# Altium PCB PCB1.PcbDoc
Units mm, origin at the board's own origin, x right, y up, seen from the top; angles counter-clockwise.
Board outline 152.4 x 101.6 mm, 4 copper layers (Signal, GND1, POWER, GND2), stack 0.602 mm thick; 65 components, 46 nets, 210 pads, 2 vias.
Unrouted connection lines stored in the file: 1.
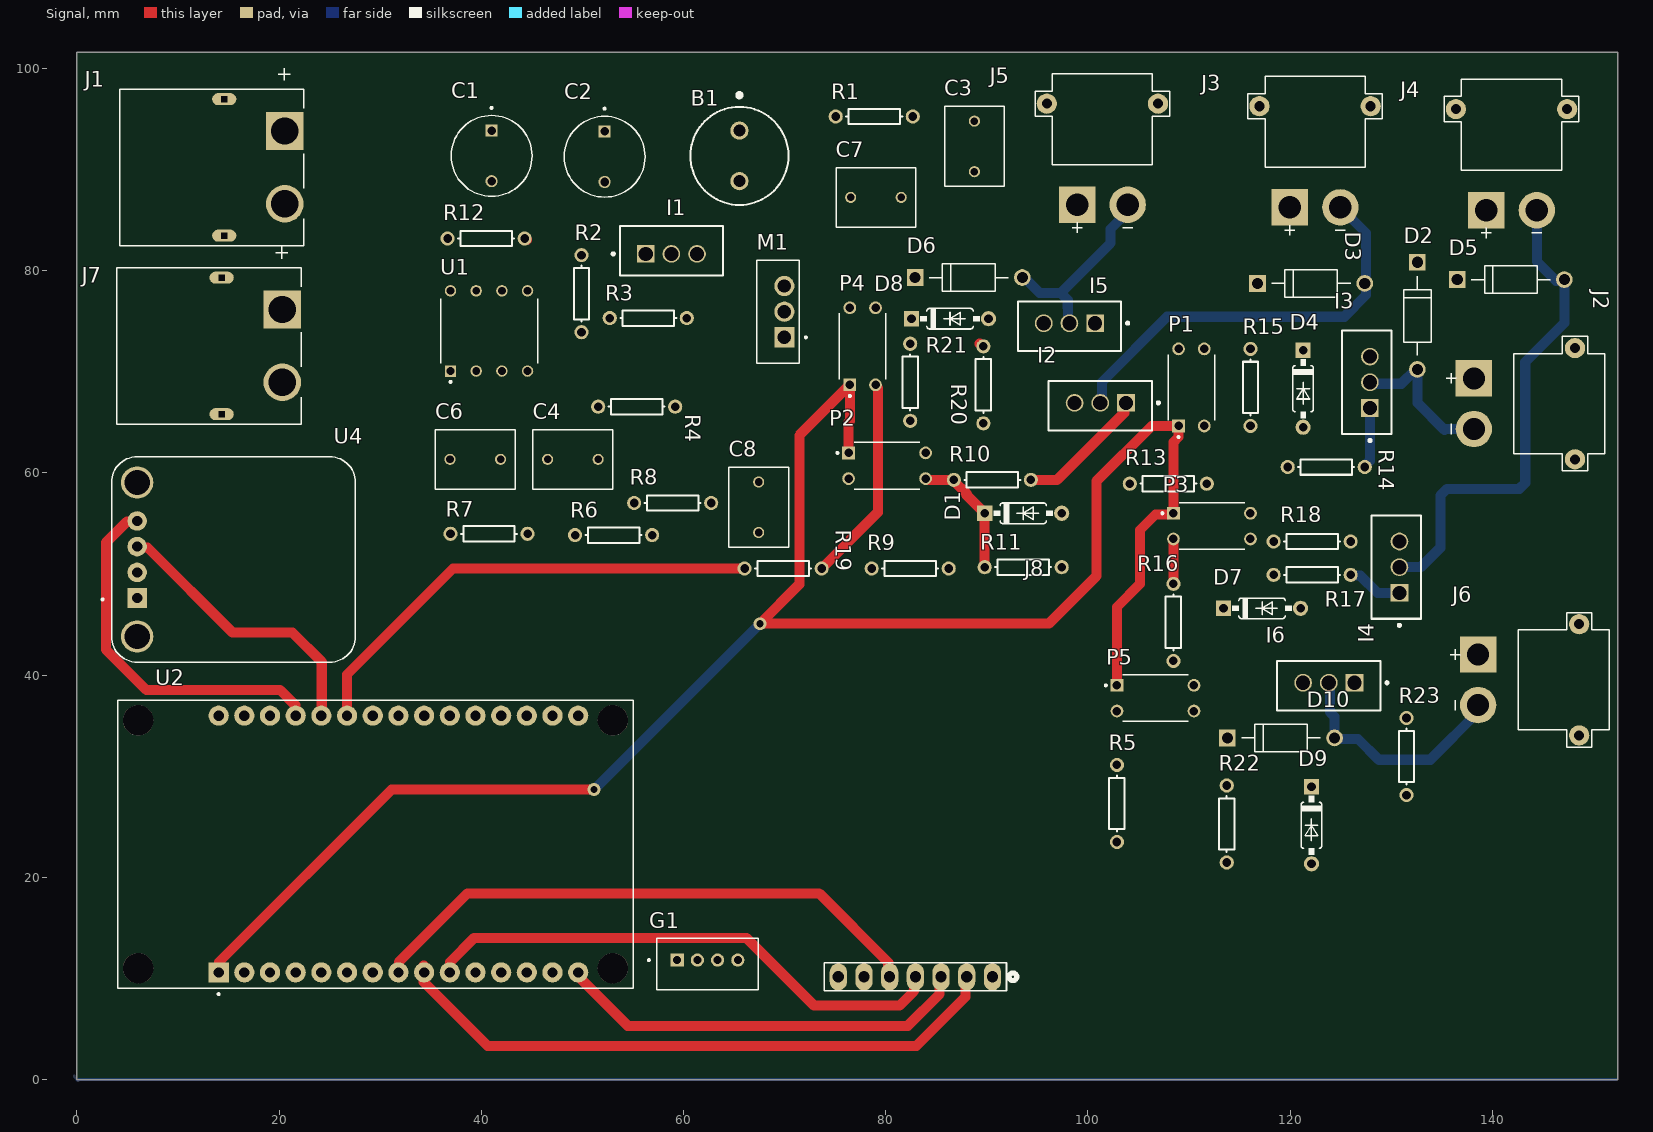
[diagram p0: Signal view]
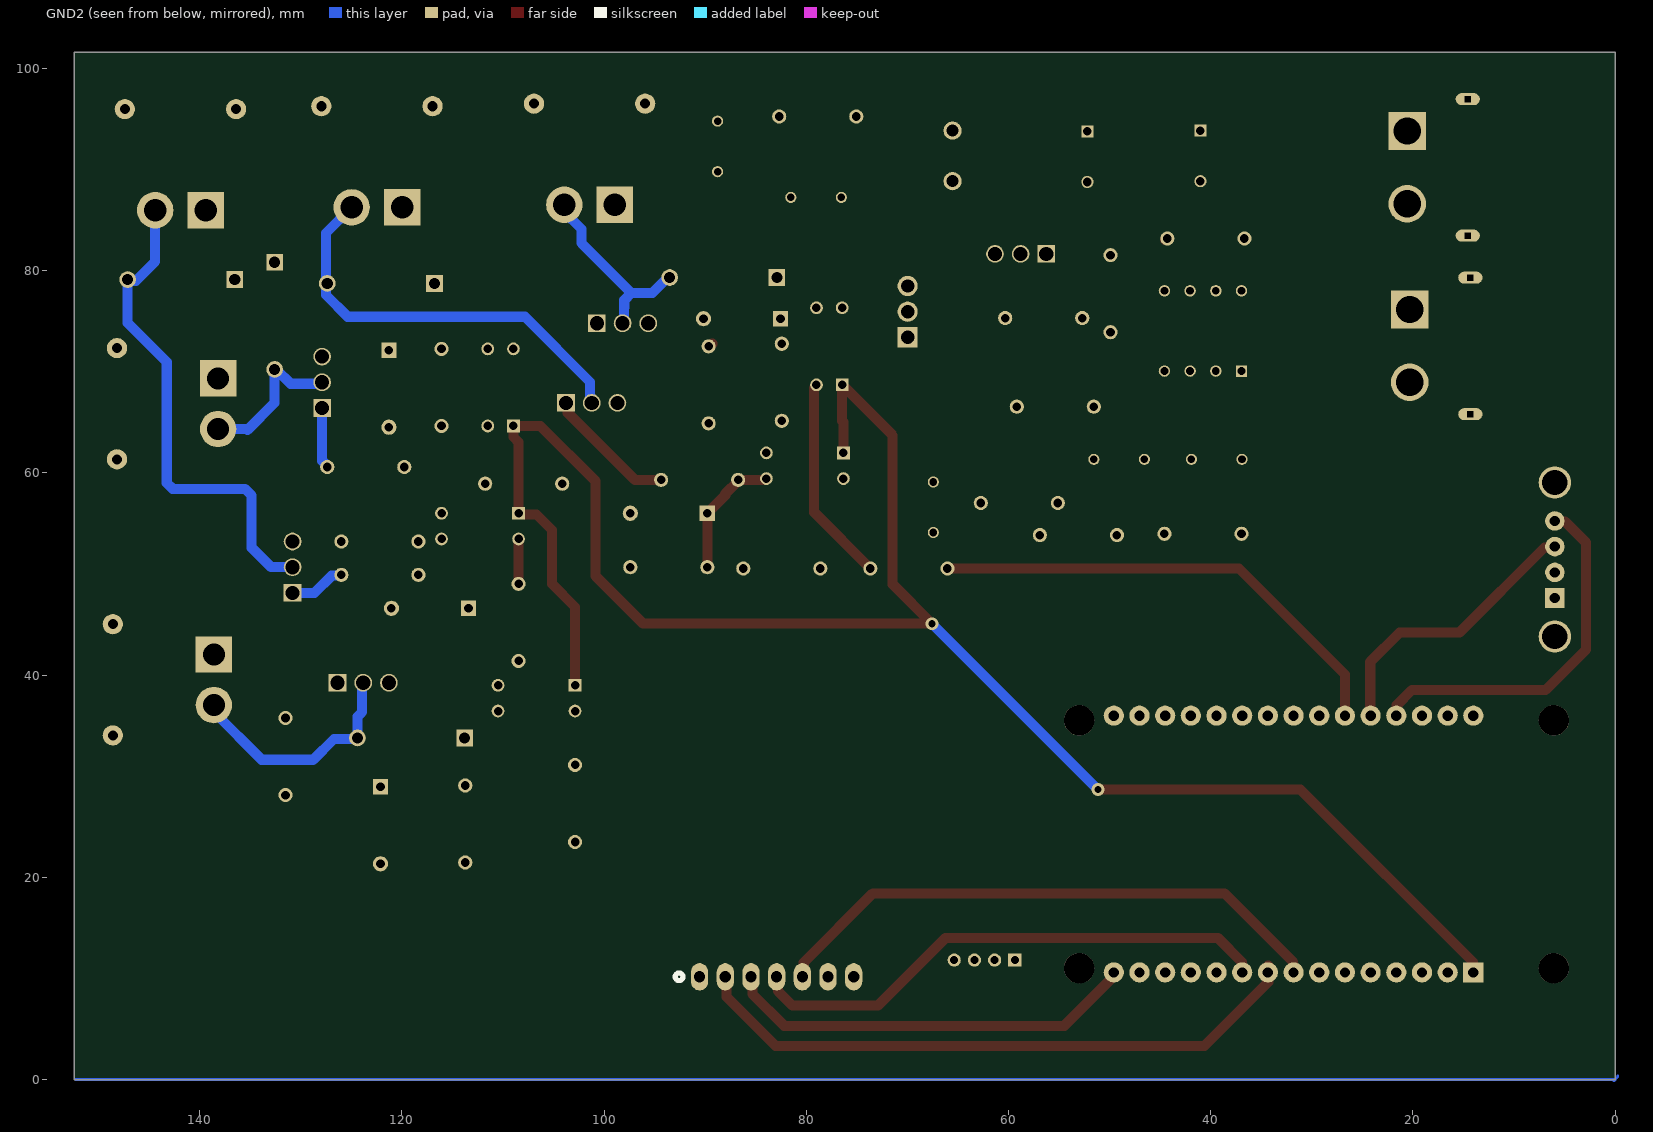
[diagram p1: GND2 view, seen from below]
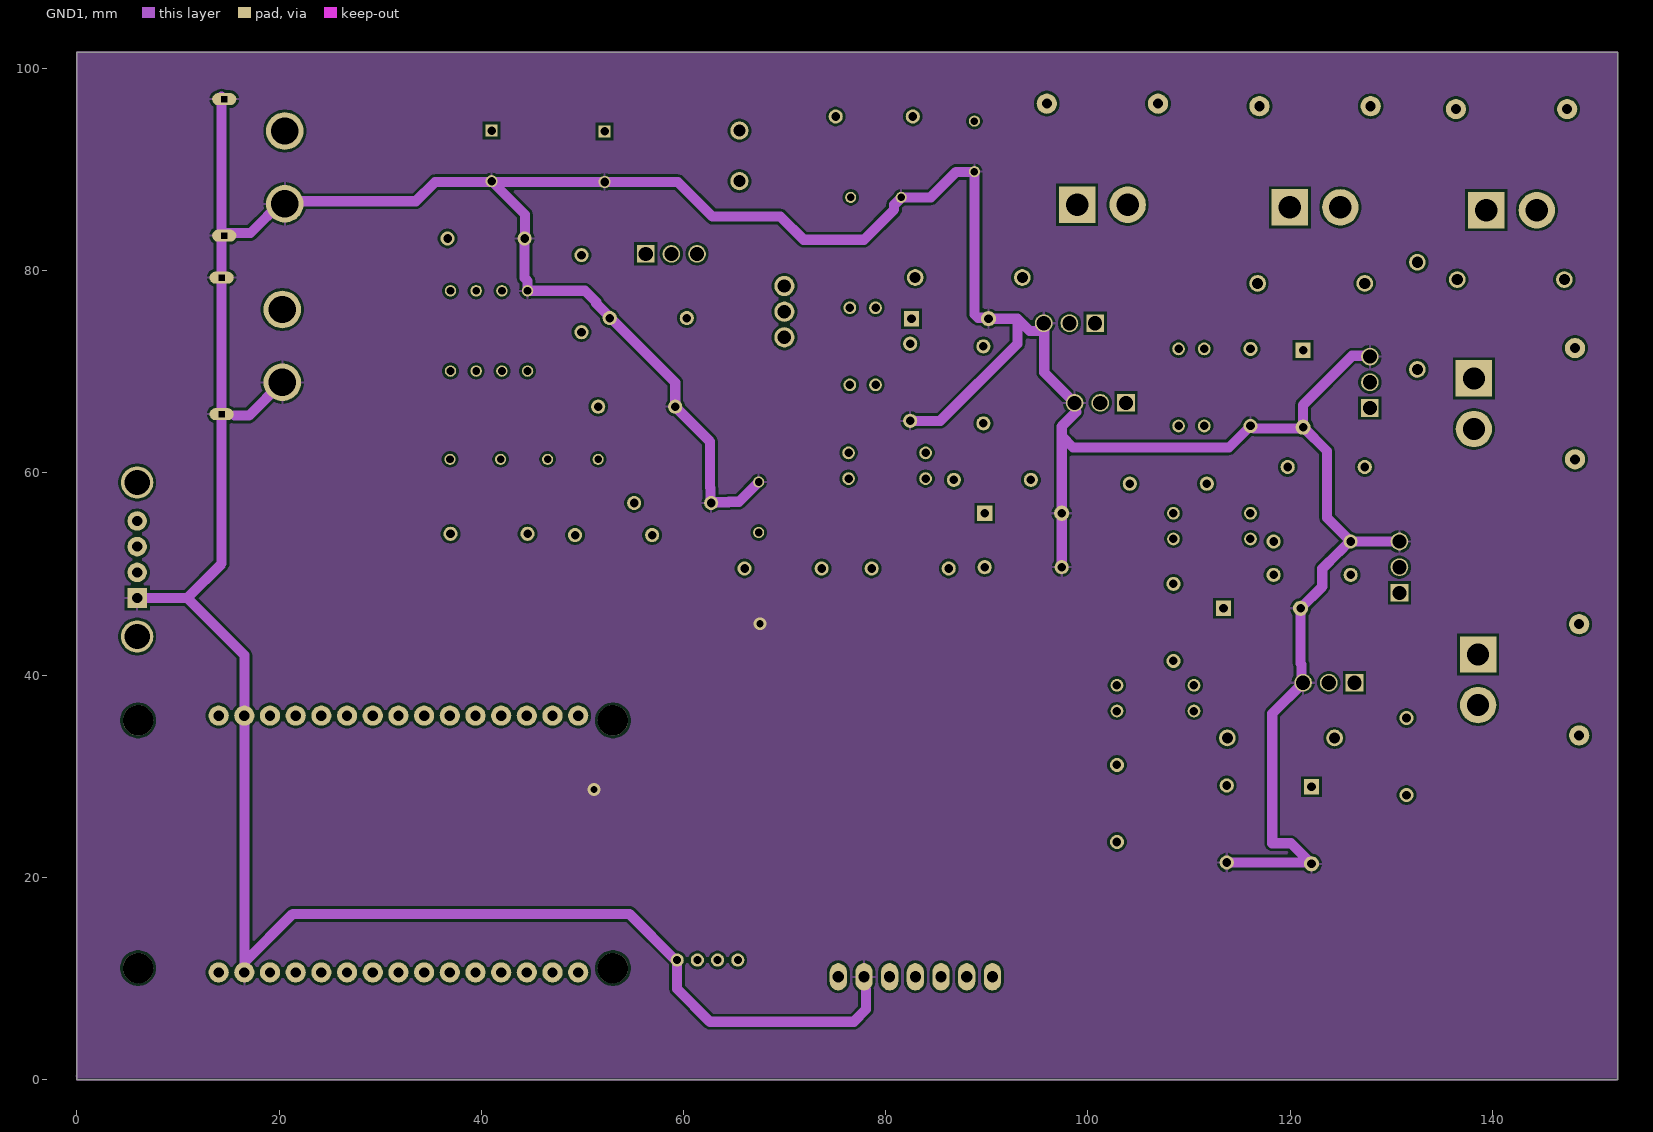
[diagram p2: GND1]
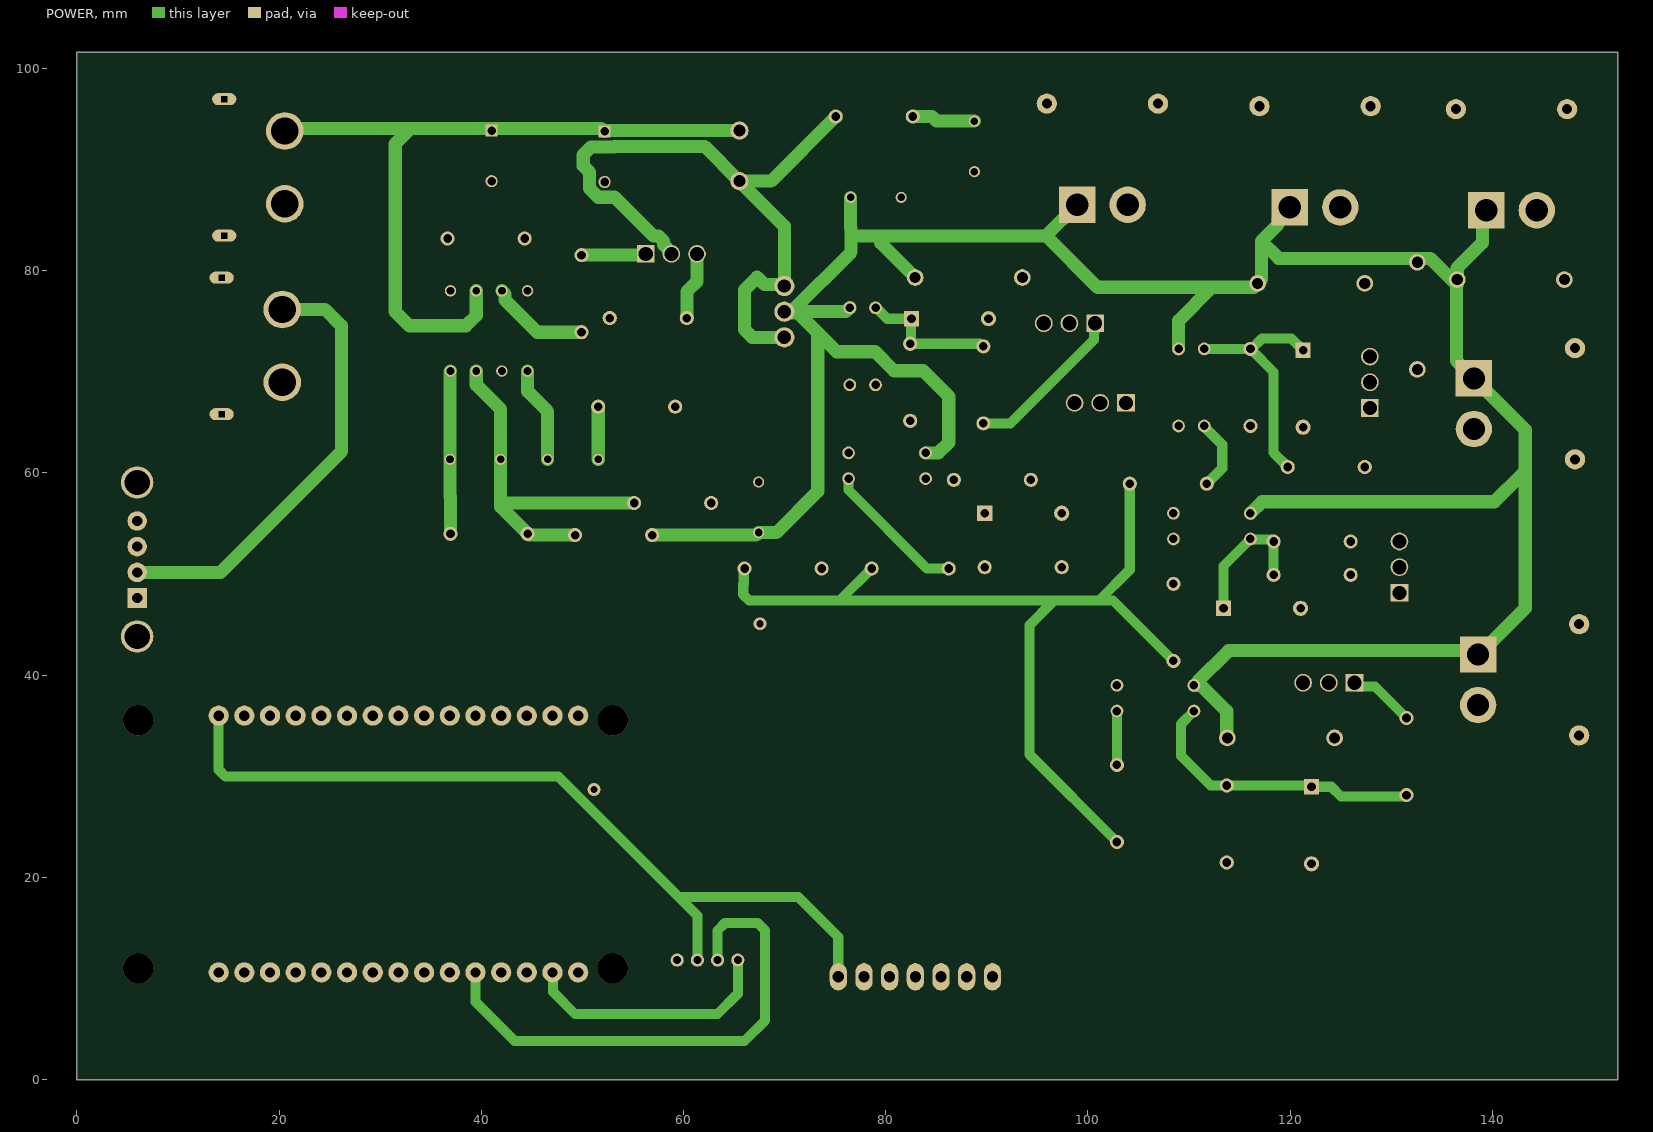
[diagram p3: POWER]

## Layer stack, top to bottom
Top Solder: solder mask 0.0102, Solder Resist, Dk 3.5
Signal: signal copper 0.035
Dielectric 2: prepreg 0.0711, PP-006, Dk 4.1
GND1: signal copper 0.035
Dielectric 1: dielectric 0.32, FR-4, Dk 4.8
POWER: signal copper 0.035
Dielectric 3: prepreg 0.0711, PP-006, Dk 4.1
GND2: signal copper 0.035
Bottom Solder: solder mask 0.0102, Solder Resist, Dk 3.5

## Board outline
0,0 152.4,0 152.4,101.6 0,101.6

## Design rules (kind name [scope] priority, off if disabled: settings)
AssemblyTestPointUsage [All] p1: isadvanced=TRUE
AssemblyTestpoint [All] p1: isadvanced=TRUE testpointundercomponent=TRUE minsize=1.016 maxsize=2.54 preferedsize=1.524 minholesize=0 maxholesize=1.016 preferedholesize=0.813 testpointgrid=0.025 usegrid=TRUE gridtolerance=0 allowsidetop=TRUE allowsidebottom=TRUE
Clearance Clearance_1 [(ExistsOnLayer('GND1') Or ExistsOnLayer('POWER')) vs (ExistsOnLayer('GND1') Or ExistsOnLayer('POWER'))] p1: gap=0.254 ignorepadtopadclearanceinfootprint=FALSE sourcerule=38 cellrowname=All cellrowtype=0 cellcolname=All cellcoltype=0 innerlayers=TRUE
Clearance Clearance_2 [(ExistsOnLayer('Signal') Or ExistsOnLayer('GND2')) vs (ExistsOnLayer('Signal') Or ExistsOnLayer('GND2'))] p2: gap=0.254 ignorepadtopadclearanceinfootprint=FALSE sourcerule=38 cellrowname=All cellrowtype=0 cellcolname=All cellcoltype=0 outerlayers=TRUE
Clearance [All] p3: gap=0.254 ignorepadtopadclearanceinfootprint=FALSE ismatrix=TRUE
ComponentClearance [All] p1: isadvanced=TRUE gap=0.254 collisioncheckmode=3 verticalgap=0.254 showdistances=FALSE
FabricationTestPointUsage [All] p1: isadvanced=TRUE valid=0 allowmultiple=FALSE
FabricationTestpoint [All] p1: isadvanced=TRUE side=3 testpointundercomponent=TRUE minsize=1.016 maxsize=2.54 preferedsize=1.524 minholesize=0 maxholesize=1.016 preferedholesize=0.813 testpointgrid=0.025 allowsidetop=TRUE allowsidebottom=TRUE usegrid=TRUE gridtolerance=0
FanoutControl Fanout_BGA [IsBGA] p1: isadvanced=TRUE bgadir=Out bgaviamode=Centered fanoutstyle=Auto fanoutdirection=Alternating viagrid=0.025 // Fanout_BGA (Default Rule)
FanoutControl Fanout_LCC [IsLCC] p2: isadvanced=TRUE bgadir=Out bgaviamode=Centered fanoutstyle=Auto fanoutdirection=Alternating viagrid=0.025 // Fanout_LCC (Default Rule)
FanoutControl Fanout_SOIC [IsSOIC] p3: isadvanced=TRUE bgadir=Out bgaviamode=Centered fanoutstyle=Auto fanoutdirection=Alternating viagrid=0.025 // Fanout_SOIC (Default Rule)
FanoutControl Fanout_Small [(CompPinCount < 5)] p4: isadvanced=TRUE bgadir=Out bgaviamode=Centered fanoutstyle=Auto fanoutdirection=OutThenIn viagrid=0.025 // Fanout_Small (Default Rule)
FanoutControl Fanout_Default [All] p5: isadvanced=TRUE bgadir=Out bgaviamode=Centered fanoutstyle=Auto fanoutdirection=Alternating viagrid=0.025 // Fanout_Default (Default Rule)
Height [All] p1: isadvanced=TRUE minheight=0 maxheight=25.4 prefheight=12.7
HoleSize [All] p1: isadvanced=TRUE absolutevalues=TRUE maxlimit=2.54 minlimit=0.025 maxpercent=80.000 minpercent=20.000
HoleToHoleClearance [All] p1: isadvanced=TRUE gap=0.254 allowstackedmicrovias=TRUE
LayerPairs [All] p1: isadvanced=TRUE enforce=TRUE
MinimumSolderMaskSliver [All] p1: isadvanced=TRUE minsoldermaskwidth=0.254
NetAntennae [All] p1: isadvanced=TRUE netantennaetolerance=0
PasteMaskExpansion [All] p1: isadvanced=TRUE expansion=0
PlaneClearance [All] p1: isadvanced=TRUE clearance=0.508
PlaneConnect [All] p1: isadvanced=TRUE planeconnectstyle=Relief reliefexpansion=0.508 reliefentries=4 reliefconductorwidth=0.254 reliefairgap=0.254
PolygonConnect [All] p1: connectstyle=Relief reliefconductorwidth=0.254 reliefentries=4 polygonreliefangle="90 Angle" airgapwidth=0.254
RoutingCorners [All] p1: isadvanced=TRUE cornerstyle=45-Degree minsetback=2.54 maxsetback=2.54
RoutingPriority [All] p1: isadvanced=TRUE routingpriority=0
RoutingVias [All] p1: holewidth=0.711 width=1.27 viastyle="Through Hole" minholewidth=0.711 minwidth=1.27 maxholewidth=0.711 maxwidth=1.27
ShortCircuit [All] p1: isadvanced=TRUE allowed=FALSE
SilkToSilkClearance [All] p1: isadvanced=TRUE silktosilkclearance=0.254
SilkToSolderMaskClearance [IsPad] p1: isadvanced=TRUE minsilkscreentomaskgap=0.254 clearancetoexposedcopper=TRUE
SolderMaskExpansion [All] p1: isadvanced=TRUE expansion=0 istentingtop=FALSE
SupplyNets "Schematic Supply Nets" [InNet('GND')] p1: isadvanced=TRUE voltage=0.000
UnRoutedNet [All] p1: isadvanced=TRUE
UnpouredPolygon [All] p1: isadvanced=TRUE
Width MaxMinWidth_1 [All] p1: isadvanced=TRUE maxlimit=1.3 minlimit=0.254 preferedwidth=1.3 toplayer_maxwidth=1 toplayer_prefwidth=1 midlayer1_maxwidth=1 midlayer1_prefwidth=1 bottomlayer_maxwidth=1 bottomlayer_prefwidth=1 minimp=50.000000 maximp=50.000000 favimp=50.000000
Width [All] p2: maxlimit=0.254 minlimit=0.254 preferedwidth=0.254
4 further rules are at their usual default settings.

## Components (designator, comment, footprint, x,y, rotation, side; value= is the part's Value field where it differs from the comment)
B1 "47uH ind" 47uH 65.532,91.48 r270 top
C1 "220Uf" Cap-Electrolitico 47.32,91.353 r270 top
C2 "1Uf" Cap-Electrolitico 58.496,91.273 r270 top
C3 "2.2nF" Ceramic_CAP 81.661,91.857 r90 top
C4 "1.5nF" Ceramic_CAP 49.494,54.229 r180 top
C6 "1nF" Ceramic_CAP 38.978,68.453 r0 top
C7 "47uF" Ceramic_CAP 79.466,80.137 r180 top
C8 "47uF" Ceramic_CAP 74.549,57.034 r270 top
D1 "Zener" Zener 38.176,65.66 r0 top
D2 "1N4007" 1N4007 137.465,75.226 r270 top
D3 "1N4007" 1N4007 122.386,83.617 r0 top
D4 "Zener" Zener 130.937,123.749 r270 top
D5 "1N4007" 1N4007 142.13,83.998 r0 top
D6 "1N4007" 1N4007 88.519,84.201 r0 top
D7 "Zener" Zener 61.798,56.261 r0 top
D8 "Zener" Zener 30.937,84.901 r0 top
D9 "Zener" Zener 131.764,80.569 r270 top
D10 "1N4007" 1N4007 119.397,38.659 r0 top
G1 "4pin Grove connector" "4 pin grove conector" 62.373,11.811 r0 top
I1 "IRFB4110" IRFB4110 58.598,81.636 r90 top
I2 "IRFB4110" IRFB4110 101.422,66.954 r270 top
I3 "IRFB4110" IRFB4110 127.914,68.758 r180 top
I4 "IRFB4110" IRFB4110 130.835,50.47 r180 top
I5 "IRFB4110" IRFB4110 98.374,74.828 r270 top
I6 "IRFB4110" IRFB4110 124.028,39.268 r270 top
J1 "Xt60_90" Xt60_90 -24.415,87.293 r270 top
J2 "xt30_90" XT30_90 129.05,66.309 r270 top
J3 "xt30_90" XT30_90 123,77.14 r0 top
J4 "xt30_90" XT30_90 142.432,76.853 r0 top
J5 "xt30_90" XT30_90 101.967,77.394 r0 top
J6 "xt30_90" XT30_90 129.464,39.003 r270 top
J7 "Xt60_90" Xt60_90 -24.669,69.64 r270 top
J8 "MCP2515" MCP2515 83.312,29.591 r270 top
M1 "MBR20100CT" MBR20100CT 69.596,75.946 r90 top
P1 "PC817X3NSZ1B" PC817X3NSZ1B 110.109,68.453 r90 top
P2 "PC817X3NSZ1B" PC817X3NSZ1B 80.137,60.833 r0 top
P3 "PC817X3NSZ1B" PC817X3NSZ1B 112.268,54.864 r0 top
P4 "PC817X3NSZ1B" PC817X3NSZ1B 77.597,72.517 r90 top
P5 "PC817X3NSZ1B" PC817X3NSZ1B 106.68,37.846 r0 top
R1 "10" Resistor_U -57.836,104.75 r0 top
R2 "10" Resistor_U 40.411,-58.979 r90 top
R3 "1" Resistor_U -80.188,84.811 r0 top
R4 "10k" Resistor_U 192.075,57.048 r180 top
R5 "330" Resistor_U 112.37,164.008 r270 top
R6 "33k" Resistor_U -83.617,63.348 r0 top
R7 "100k" Resistor_U -95.936,63.475 r0 top
R8 "1.8k" Resistor_U 195.631,47.523 r180 top
R9 "330" Resistor_U 219.126,41.046 r180 top
R10 "100" Resistor_U 227.254,49.809 r180 top
R11 "10k" Resistor_U -43.104,60.174 r0 top
R12 "1.8k" Resistor_U 177.178,73.685 r180 top
R13 "330" Resistor_U 244.653,49.428 r180 top
R14 "100" Resistor_U 260.274,51.079 r180 top
R15 "10k" Resistor_U 125.579,205.155 r270 top
R16 "330" Resistor_U 117.958,181.915 r270 top
R17 "100" Resistor_U 258.877,40.411 r180 top
R18 "10k" Resistor_U -14.529,62.713 r0 top
R19 "330" Resistor_U 206.553,41.046 r180 top
R20 "100" Resistor_U 80.162,-67.996 r90 top
R21 "10k" Resistor_U 91.923,205.664 r270 top
R22 "10k" Resistor_U 123.23,161.976 r270 top
R23 "100" Resistor_U 141.012,168.648 r270 top
U1 "UC2843NG4" UC3843 41.021,74.168 r90 top
U2 "Esp32 30 pin" "ESP32 30 pin" 27.305,22.225 r90 top
U4 "DRV8871 Modulo" "DRV8871 Modulo" 15.113,50.165 r270 top

## Footprints (in the part's own frame and the unit in brackets; to place one, negate y for a bottom-side part, rotate by r counter-clockwise, add the part's x,y. Pads: shape width x height; smd on the part's side, far side on the other; paste and mask are expansions set on the pad)
1N4007 [mm]
  round 1.65 hole 1.1: A(4.995,-4.877)
  rect 1.65x1.65 / inner round 1.65 / far side rect 1.65x1.65 hole 1.1: C(-5.605,-4.877)
  silkscreen extent -4.2,-6.23 3.6,-3.53, body extent -5.78,-6.22 5.17,-3.53, height 2.69
"4 pin grove conector" [mm]
  rect 1.308x1.308 / inner round 1.308 / far side rect 1.308x1.308 hole 0.8: 1(-3,0)
  round 1.308 hole 0.8: 2(-1,0) 3(1,0) 4(3,0)
  silkscreen extent -5.9,-2.95 5,2.15, body extent -5,-2.95 5,2.15, height 8.1
47uH [mm]
  round 1.8 hole 1.2 mask+0.102: 1(-2.373,0) 2(2.627,0)
  silkscreen extent -6.07,-4.85 4.98,4.85
Cap-Electrolitico [mm]
  round 1.2 hole 0.85: N(2.5,-6.299)
  rect 1.2x1.2 hole 0.85: P(-2.5,-6.299)
  silkscreen extent -4.85,-10.3 4,-2.3, body extent -4,-10.3 4,-2.3, height 11.5
Ceramic_CAP [mm]
  round 1.1 hole 0.75: 1(-2.068,-7.112) 2(2.932,-7.112)
  silkscreen extent -3.52,-10.06 4.38,-4.16, body extent -3.52,-10.06 4.38,-4.16, height 10
"DRV8871 Modulo" [mil]
  rect 76x76 hole 39.37: 1(100,-360)
  round 76 hole 39.37 unplated: 2(0,-360)
  round 76 hole 39.37: 3(-100,-360) 4(-200,-360)
  round 125.98 hole 98.43: S1(-350,-360) S2(250,-360)
  silkscreen extent -450,-499 350,490, body extent -445,-460 355,490, height 303
"ESP32 30 pin" [mm]
  rect 2x2 / inner round 2 / far side rect 2x2 hole 1.02: 1(-11.633,13.28)
  round 2 hole 1.02: 2(-11.633,10.74) 3(-11.633,8.2) 4(-11.633,5.66) 5(-11.633,3.12) 6(-11.633,0.58) 7(-11.633,-1.96) 8(-11.633,-4.5) 9(-11.633,-7.04) 10(-11.633,-9.58) 11(-11.633,-12.12) 12(-11.633,-14.66) 13(-11.633,-17.2) 14(-11.633,-19.74) 15(-11.633,-22.28) 16(13.767,-22.28) 17(13.767,-19.74) 18(13.767,-17.2) 19(13.767,-14.66) 20(13.767,-12.12) 21(13.767,-9.58) 22(13.767,-7.04) 23(13.767,-4.5) 24(13.767,-1.96) 25(13.767,0.58) 26(13.767,3.12) 27(13.767,5.66) 28(13.767,8.2) 29(13.767,10.74) 30(13.767,13.28)
  round 3 hole 3 unplated: ""(-11.213,21.24) ""(-11.213,-25.71) ""(13.297,21.24) ""(13.297,-25.71)
  silkscreen extent -13.88,-27.71 15.3,23.24, body extent -12.85,-27.86 15.35,24.59, height 7.05
IRFB4110 [mm]
  rect 1.75x1.75 hole 1.4 paste-2539.97 mask+0: 1(0.025,2.337)
  round 1.75 hole 1.4 paste-2539.97 mask+0: 2(0.025,-0.203) 3(0.025,-2.743)
  silkscreen extent -2.12,-5.3 2.78,5.67
MBR20100CT [mm]
  rect 2x2 / inner round 2 / far side rect 2x2 hole 1.33: 1(-2.54,-0.381)
  round 2 hole 1.33: 2(0,-0.381) 3(2.54,-0.381)
  silkscreen extent -5.08,-2.6 5.08,2.34, body extent -5.08,-1.92 5.08,2.43, height 20.4
MCP2515 [mm]
  oval 2.7x1.7 hole 1.1: Cs(19.431,-2.921) GND(19.431,-5.461) Int(19.431,7.239) Miso(19.431,-0.381) Mosi(19.431,2.159) Sck(19.431,4.699) Vcc(19.431,-8.001)
  silkscreen extent 18.06,-9.4 20.8,9.65, body extent -19.42,-14.51 20.7,13.49, height 11.69
PC817X3NSZ1B [mm]
  rect 1.26x1.26 / inner round 1.26 / far side rect 1.26x1.26 hole 0.84: 1(-3.81,1.143)
  round 1.26 hole 0.84: 2(-3.81,-1.397) 3(3.81,-1.397) 4(3.81,1.143)
  silkscreen extent -5.01,-2.43 3.25,2.17, body extent -3.94,-2.43 3.94,2.17, height 4.55
Resistor_U [mm]
  round 1.4 hole 0.85: 1(132.893,-9.5) 2(140.513,-9.5)
  silkscreen extent 133.93,-10.26 139.47,-8.74, body extent 133,-10.54 140.5,-8.56, height 2.02
UC3843 [mm]
  rect 1.13x1.13 / inner round 1.13 / far side rect 1.13x1.13 hole 0.78 mask+0.102: 1(-4.097,4.064)
  round 1.13 hole 0.78 mask+0.102: 2(-4.097,1.524) 3(-4.097,-1.016) 4(-4.097,-3.556) 5(3.843,-3.556) 6(3.843,-1.016) 7(3.843,1.524) 8(3.843,4.064)
  silkscreen extent -5.26,-4.54 3.05,5.05, body extent -4.22,-4.54 3.97,5.05, height 0.25
XT30_90 [mm]
  round 3.6 hole 2.2: N(1.967,9.126)
  rect 3.6x3.6 hole 2.2: P(-3.033,9.126)
  round 2 hole 1: S1(4.967,19.126) S2(-6.033,19.126)
  silkscreen extent -7.18,6.38 6.12,22.08, body extent -7.18,8.13 6.12,22.08, height 5
Xt60_90 [mm]
  rect 3.716x3.716 / inner round 3.716 / far side rect 3.716x3.716 hole 2.7 mask+0.102: 1(-6.521,44.989)
  round 3.716 hole 2.7 mask+0.102: 2(0.679,44.989)
  oval 1.2x2.4 hole 0.6 square mask+0.102: SH1(-9.671,38.989) SH2(3.829,38.989)
  silkscreen extent -12.72,28.64 4.83,46.84, body extent -10.67,28.64 4.83,46.84, height 8.4
Zener [mm]
  round 1.5 hole 0.85: A(59.233,-9.652)
  rect 1.5x1.5 hole 0.85: C(51.613,-9.652)
  silkscreen extent 52.5,-10.67 58.34,-8.64

## Part data
C1 C2: library part "Cap Electrolitico"
C3 C4 C6 C7 C8: library part Ceramic_Cap
R1 R2 R3 R4 R5 R6 R7 R8 R9 R10 R11 R12 R13 R14 R15 R16 R17 R18 R19 R20 R21 R22 R23: library part Resistor_U
U2: "Dual core, Wi-Fi: 2.4 GHz up to 150 Mbits/s,BLE (Bluetooth Low Energy) and legacy Bluetooth, 32 bits, Up to 240 MHz"

## Via types
v1: diameter 1.27, hole 0.711, Signal to GND2, 2 vias

## Nets (pads, with @x,y where several pads share a name; then routed paths per layer and width w, separated by ;. In a path a pad name is that pad's centre, name@x,y a point inside that pad or via, vN(x,y) a via of type N, cw(c..) or ccw(c..) an arc to the next point about the centre after c; other vN are vias at no path point)
GND: C1.N C2.N C3.1 C7.1 C8.1 D1.A D4.A D7.A D8.A D9.A G1.1 I2.3 I3.3 I4.3 I5.3 I6.3 J1.2 J1.SH1 J1.SH2 J7.2 J7.SH1 J7.SH2 J8.GND R3.1 R4.1 R8.1 R11.2 R12.1 R15.2 R18.2 R21.2 R22.2 U1.5 U2.2 U2.29 U4.1 | length 471.1
  Signal w1: R12.1 44.394,83.185 R12.1@44.521,83.058 ; R21.2 R21.2@82.486,65.087 ; D8.A@90.106,75.185 D8.A
  GND1 w1: U4.1 10.922,47.625 ; J1.SH1@14.32,97.218 J1.SH2@14.32,83.718 ; 15.621,65.659 17.018,65.659 J7.2 ; C1.N C1.N@41.101,88.773 ; G1.1@59.219,11.811 54.647,16.383 21.361,16.383 16.605,11.627 16.605,10.632 U2.2 16.692,10.592 16.565,10.719 U2.29 16.565,41.982 10.922,47.625 ; G1.1 59.373,8.953 62.611,5.715 76.835,5.715 78.041,6.921 J8.GND@78.041,8.89 ; C8.1 65.485,57.15 64.487,57.15 64.437,57.1 62.815,57.1 R8.1 62.661,57.1 62.661,58.497 62.611,58.547 62.611,63.119 R4.1 59.182,68.942 51.371,76.753 51.371,76.898 50.259,78.011 U1.5 44.577,78.994 44.285,79.286 R12.1 44.323,83.223 44.323,85.551 C1.N@41.101,88.773 ; R21.2@82.5,65.074 R21.2 85.407,65.151 93.026,72.77 93.026,75.249 ; R11.2 D1.A 97.409,63.627 ; R22.2 121.631,21.463 121.663,21.432 122.016,21.432 D9.A 120.08,23.368 118.237,23.368 118.237,36.195 I6.3 121.141,39.387 121.141,41.038 121.031,41.148 D7.A 123.174,48.752 123.174,50.53 124.777,52.133 124.796,52.133 125.876,53.213 R18.2 ; D4.A@121.284,64.389 121.284,66.73 126.143,71.59 127.8,71.59 I3.3 ; I4.3 R18.2 ; 10.922,47.625 14.32,51.023 J7.SH2 J7.SH1 J1.SH2@14.32,83.718 ; J1.SH2@14.32,83.718 17.17,83.718 20.32,86.868 33.528,86.868 35.433,88.773 40.8,88.773 40.841,88.815 40.979,88.815 41.021,88.773 C1.N@41.101,88.773 ; C1.N@41.101,88.773 C2.N 59.436,88.773 62.865,85.344 69.596,85.344 71.882,83.058 77.851,83.058 80.835,86.042 80.835,86.523 81.534,87.222 C7.1 84.455,87.249 86.976,89.77 88.754,89.77 C3.1 88.773,75.692 89.121,75.345 90.074,75.345 D8.A 93.026,75.249 ; 93.026,75.249 94.234,74.041 95.58,74.041 95.682,74.143 95.682,69.926 I2.3 98.823,66.785 98.823,66.061 98.844,66.04 97.409,64.605 97.409,63.627 ; 97.409,63.627 98.523,62.513 113.95,62.513 R15.2 116.188,64.642 116.441,64.389 120.804,64.389 120.836,64.42 121.189,64.42 D4.A 123.644,62.157 123.644,55.553 R18.2
  GND2 w1: U2.2 U2.2@16.605,10.632
NetB1_1: B1.1 C1.P C2.P J1.1 U1.7 | length 75.6
  POWER w1.3: J1.1@20.32,94.068 33.02,94.068 ; U1.7 39.497,75.565 38.481,74.549 32.893,74.549 31.496,75.946 31.496,92.544 33.02,94.068 ; B1.1 52.277,93.853 C2.P 51.902,94.068 33.02,94.068
NetB1_2: B1.2 I1.2 M1.1 M1.3 R1.1 | length 68.6
  POWER w1.3: I1.2 58.801,81.783 58.04,82.544 58.04,82.91 57.51,83.44 57.022,83.44 53.193,87.269 51.574,87.269 50.693,88.15 50.693,89.769 50.081,90.381 50.081,91.457 50.843,92.219 53.121,92.219 53.201,92.299 62.086,92.299 B1.2 69.977,84.408 M1.3@69.977,78.596 ; B1.2@66.167,88.853 68.66,88.853 R1.1 ; M1.1 66.802,73.406 66.04,74.168 66.04,78.105 67.286,79.351 68.018,78.62 69.953,78.62 M1.3@69.977,78.596 ; M1.3 M1.3@69.977,78.596
NetC3_2: C3.2 R1.2 | length 6.3
  POWER w1.3: R1.2 84.582,95.25 85.043,94.789 C3.2
NetC4_1: C4.1 R4.2 | length 5.2
  POWER w1.3: C4.1 R4.2
NetC4_2: C4.2 U1.4 | length 9.6
  POWER w1.3: U1.4 44.577,68.072 46.562,66.087 C4.2
NetC6_1: C6.1 R7.1 U1.1 | length 16.1
  POWER w1.3: R7.1 36.957,57.648 36.91,57.695 C6.1 36.91,70.024 U1.1
NetC6_2: C6.2 R6.1 R7.2 R8.2 U1.2 | length 36.3
  POWER w1.3: U1.2 39.497,68.707 41.91,66.294 C6.2 41.91,56.642 ; R6.1 44.731,53.848 44.604,53.975 R7.2 41.91,56.642 ; R8.2 42.291,57.023 41.91,56.642
NetC7_2: C7.2 C8.2 D2.C D3.C D5.C D6.C D10.C J2.P J3.P J4.P J5.P J6.P M1.2 P1.4 P2.4 P3.4 P4.4 P5.4 R6.2 | length 282.3
  POWER w1.3: R6.2 67.183,53.848 C8.2 69.215,54.102 73.279,58.166 73.279,73.852 ; M1.2 70.485,75.946 70.595,75.836 M1.2@70.8,75.836 ; M1.2@70.824,76.08 76.581,81.837 76.581,83.439 ; P4.4 76.073,75.946 71.185,75.946 73.279,73.852 ; C7.2 76.534,84.248 76.581,84.201 76.581,83.439 ; D6.C 79.502,82.736 79.502,83.439 ; P2.4 85.217,61.976 86.233,62.992 86.233,67.564 83.693,70.104 80.821,70.104 78.948,71.978 75.153,71.978 73.279,73.852 ; J5.P 95.853,83.439 ; P1.4 108.966,75.057 112.268,78.359 ; P5.4 111.174,38.989 113.725,36.438 113.725,33.849 D10.C ; P5.4@110.832,39.331 113.919,42.418 138.208,42.418 J6.P ; P3.4 117.221,57.15 140.208,57.15 143,59.942 143.256,59.942 ; J3.P 118.817,85.116 118.817,84.574 117.162,82.919 ; J4.P 139.017,85.597 139.017,82.756 136.533,80.272 136.533,78.68 D5.C@136.466,78.613 ; J6.P@139.954,43.307 143.256,46.609 143.256,59.942 ; 76.581,83.439 79.502,83.439 ; 79.502,83.439 95.853,83.439 ; 95.853,83.439 100.933,78.359 112.268,78.359 ; 112.268,78.359 116.4,78.359 D3.C 117.162,79.121 117.162,82.919 ; 117.162,82.919 118.866,81.215 133.864,81.215 D5.C@136.466,78.613 ; D5.C@136.466,78.613 136.466,71.052 J2.P 143.256,64.262 143.256,59.942
NetD1_C: D1.C P2.3 R10.2 R11.1 | length 12.7
  Signal w1: P2.3 84.017,59.436 84.144,59.309 R10.2 86.741,59.201 88.012,57.93 88.012,57.786 D1.C R11.1
NetD2_A: D2.A I3.2 J2.N | length 16.2
  GND1 w1: D2.A@132.466,69.931 132.804,70.268 D2.A@132.498,70.268
  GND2 w1: I3.2 128.033,68.817 130.999,68.817 132.412,70.231 D2.A 132.588,66.929 135.255,64.262 135.335,64.342 J2.N
NetD3_A: D3.A I2.2 J3.N | length 42.4
  GND1 w1: J3.N J3.N@125.464,85.769 ; D3.A@127.308,78.667 D3.A
  GND2 w1: I2.2 101.363,67.073 101.363,67.603 101.384,67.624 101.384,68.999 107.823,75.438 125.349,75.438 127.508,77.597 127.506,77.599 127.506,78.74 127.506,83.727 J3.N
NetD4_C: D4.C P1.3 R14.2 R15.1 | length 23.8
  Signal w1: R15.1 R15.1@116.187,72.262 ; R14.2 R14.2@119.761,60.603
  POWER w1: P1.3 R15.1 116.188,72.262 117.204,73.279 120.142,73.279 D4.C ; R15.1@116.221,72.121 118.364,69.978 118.364,62 R14.2@119.761,60.603
NetD5_A: D5.A I4.2 J4.N | length 49.8
  GND1 w1: I4.2 I4.2@130.954,50.817
  GND2 w1: I4.2@130.491,50.673 132.93,50.673 134.855,52.597 134.855,57.766 135.509,58.42 142.67,58.42 143.256,59.006 143.256,70.958 147.125,74.827 D5.A 147.001,78.997 146.307,78.997 146.304,78.994 144.399,80.899 J4.N
NetD6_A: D6.A I5.2 J5.N | length 21.8
  Signal w1: J5.N@103.934,85.816 J5.N
  GND1 w1: D6.A D6.A@93.639,79.449 ; I5.2@98.027,74.947 I5.2 ; J5.N@103.437,85.301 103.437,86.023 J5.N
  GND2 w1: D6.A 93.69,79.324 95.229,77.786 97.3,77.786 ; I5.2 98.027,74.947 98.027,76.365 98.006,76.386 98.006,77.08 97.3,77.786 ; J5.N 103.934,85.816 102.234,84.116 102.234,82.719 97.3,77.786
NetD7_C: D7.C P3.3 R17.2 R18.1 | length 13.9
  Signal w1: P3.3@116.078,53.397 P3.3 P3.3@116.148,53.467 ; R18.1@118.287,53.29 R18.1
  POWER w1: D7.C 113.411,50.8 P3.3 116.128,53.417 118.052,53.417 118.256,53.213 R18.1 R17.2
NetD8_C: D8.C P4.3 R20.2 R21.1 | length 13.9
  Signal w1: P4.3 P4.3@79.064,76.327 ; R21.1 R21.1@82.486,72.834 ; D8.C@82.486,75.185 D8.C ; R20.2@89.3,72.771 89.554,72.517 R20.2
  POWER w1: P4.3@79.064,76.327 80.142,75.249 D8.C ; R21.1 R20.2@89.3,72.771 ; R21.1@82.486,72.834 D8.C@82.486,75.185
NetD9_C: D9.C P5.3 R22.1 R23.2 | length 29
  Signal w1: R22.1 R22.1@113.793,29.019 ; D9.C@122.048,29.019 D9.C
  POWER w1: P5.3 109.22,35.179 109.22,32.004 112.141,29.083 R22.1 121.985,29.083 D9.C 124.079,28.956 125.033,28.002 R23.2@131.38,28.002
NetD10_A: D10.A I6.2 J6.N | length 23.4
  GND2 w1: I6.2 123.949,39.119 123.949,36.335 124.392,35.892 D10.A 124.49,33.684 126.717,33.684 128.778,31.623 133.858,31.623 138.59,36.355 J6.N
NetG1_2: G1.2 J8.Vcc U2.30 | length 84.4
  POWER w1: U2.30 14.025,30.63 14.683,29.972 47.625,29.972 59.563,18.034 ; G1.2 61.373,16.224 59.563,18.034 ; J8.Vcc 75.311,14.097 71.374,18.034 59.563,18.034
NetG1_3: G1.3 U2.11 | length 51.1
  POWER w1: U2.11 39.425,7.692 43.307,3.81 66.04,3.81 68.072,5.842 68.072,14.732 67.31,15.494 64.135,15.494 63.373,14.732 G1.3
NetG1_4: G1.4 U2.14 | length 25.3
  POWER w1: U2.14 47.085,10.552 47.085,8.668 49.276,6.477 63.373,6.477 65.373,8.477 G1.4
NetI1_1: I1.1 R2.2 | length 6.4
  POWER w1.3: R2.2 56.134,81.534 I1.1
NetI1_3: I1.3 R3.2 | length 6.8
  POWER w1.3: R3.2 60.344,75.33 60.344,77.957 61.341,78.954 I1.3
NetI2_1: I2.1 R10.1 | length 13
  Signal w1: R10.1 96.958,59.309 103.594,65.945 103.594,66.764 I2.1
NetI3_1: I3.1 R14.1 | length 6.2
  GND1 w1: I3.1 I3.1@128.016,66.294
  GND2 w1: R14.1 127.381,60.687 127.889,61.195 I3.1
NetI4_1: I4.1 R17.1 | length 5.8
  GND1 w1: I4.1@130.645,48.298 I4.1
  GND2 w1: R17.1 126.061,49.834 126.95,49.834 128.651,48.133 I4.1
NetI5_1: I5.1 R20.1 | length 15.4
  POWER w1: R20.1 92.335,64.897 100.597,73.159 100.597,73.978 I5.1@100.762,74.143
NetI6_1: I6.1 R23.1 | length 6.6
  POWER w1: I6.1 126.74,38.868 128.4,38.868 R23.1
NetJ7_1: J7.1 U4.2 | length 44.1
  POWER w1.3: U4.2 14.224,50.165 26.162,62.103 26.162,74.549 24.55,76.161 J7.1
NetJ8_Cs: J8.Cs U2.8 | length 56.6
  Signal w1: U2.8 31.845,10.632 31.845,11.627 38.633,18.415 73.419,18.415 80.257,11.577 80.257,10.294 J8.Cs
NetJ8_Miso: J8.Miso U2.10 | length 52.8
  Signal w1: U2.10 36.925,10.632 36.925,11.627 39.31,14.012 66.218,14.012 72.92,7.31 81.364,7.31 82.797,8.743 82.797,10.026 J8.Miso
NetJ8_Mosi: J8.Mosi U2.15 | length 41.2
  Signal w1: U2.15 49.777,10.4 49.777,10.008 54.474,5.31 82.193,5.31 85.337,8.454 85.337,10.026 J8.Mosi
NetJ8_Sck: J8.Sck U2.9 | length 61.9
  Signal w1: U2.9@34.305,11.259 34.305,9.636 40.631,3.31 83.021,3.31 87.877,8.166 87.877,10.026 J8.Sck
NetP1_1: P1.1 P2.1 P3.1 P4.1 P5.1 U2.1 | length 186
  Signal w1: U2.1 14.065,10.632 14.065,11.627 31.112,28.674 v1(51.153,28.674) ; P2.1 76.327,65.024 76.454,65.151 P4.1 71.46,63.713 71.46,48.981 v1(67.564,45.085) 96.139,45.085 100.838,49.784 100.838,59.182 106.299,64.643 P1.1 108.966,63.543 108.458,63.035 P3.1 ; P5.1 102.87,46.736 105.156,49.022 105.156,54.356 106.68,55.88 107.823,55.88
  GND2 w1: v1(51.153,28.674) v1(67.564,45.085)
NetP1_2: P1.2 R13.1 | length 7.1
  POWER w1: P1.2 111.506,64.573 113.284,62.795 113.284,60.452 R13.1
NetP2_2: P2.2 R9.1 | length 14.3
  POWER w1: P2.2 76.315,59.424 76.315,58.305 84.074,50.546 R9.1
NetP3_2: P3.2 R16.1 | length 4.4
  Signal w1: R16.1 P3.2
NetP4_2: P4.2 R19.1 | length 20.6
  Signal w1: R19.1 79.219,56.105 79.219,68.412 78.994,68.637 P4.2
NetP5_2: P5.2 R5.1 | length 5.3
  POWER w1: R5.1 P5.2
NetR2_1: R2.1 U1.6 | length 9.9
  POWER w1.3: U1.6 42.362,77.686 42.362,77.094 45.542,73.914 R2.1
NetR5_2: R5.2 R9.2 R13.2 R16.2 R19.2 U2.25 | length 141.4
  Signal w1: U2.25 26.725,40.06 37.211,50.546 R19.2
  POWER w1: U2.25@26.685,36.032 U2.25 ; R19.2 65.963,50.469 65.963,49.007 65.913,48.957 65.913,47.957 66.499,47.371 75.438,47.371 ; R9.2 75.438,47.371 ; R5.2 94.234,32.131 94.234,44.958 96.52,47.244 96.52,47.371 ; R13.2 104.14,50.419 101.092,47.371 ; R16.2 102.489,47.371 101.092,47.371 ; 75.438,47.371 96.52,47.371 ; 96.52,47.371 101.092,47.371
NetR12_2: R12.2 U1.8 | length 0.1
  Signal w1: R12.2@36.665,83.077 R12.2 ; U1.8 U1.8@36.957,78.046
NetU1_3: U1.3
NetU2_26: U2.26 U4.3 | length 28.3
  Signal w1: U4.3 6.044,52.63 6.99,52.63 15.424,44.196 21.336,44.196 24.225,41.307 24.225,36.032 U2.26
NetU2_27: U2.27 U4.4 | length 36.6
  Signal w1: U4.4 5.894,55.17 4.948,55.17 2.869,53.091 2.869,42.531 6.878,38.522 20.111,38.522 21.605,37.027 21.605,36.032 U2.27
pads on no net: J2.S1 J2.S2 J3.S1 J3.S2 J4.S1 J4.S2 J5.S1 J5.S2 J6.S1 J6.S2 J8.Int U2. U2.3 U2.4 U2.5 U2.6 U2.7 U2.12 U2.13 U2.16 U2.17 U2.18 U2.19 U2.20 U2.21 U2.22 U2.23 U2.24 U2.28 U4.S1 U4.S2
copper on no net: | length 305.2
  GND2 w0.254: -0.254,0.381 -0.254,0.254 0.127,-0.127 ; 0,0 152.273,0 0,0

## Polygon pours and split planes (outlines as drawn)
GND on GND1 "GND_L02_P001" (solid, pour order 1): 152.4,101.6 0,101.6 0,0.508 -0.254,0.254 -0.127,0.127 152.4,0.127
GND on GND1 "NONET_L02_P000" (solid, shelved, pour order 0): 0,101.6 0,0 152.273,0 152.4,0.127 152.4,101.6

## Text inside footprints (layer, text, board x,y; h text height)
I1: Mechanical 3 "DESIGNATOR" at 65.278,78.461 h1.2 r90
I2: Mechanical 3 "DESIGNATOR" at 94.742,70.129 h1.2 r270
I3: Mechanical 3 "DESIGNATOR" at 131.089,75.438 h1.2 r180
I5: Mechanical 3 "DESIGNATOR" at 91.694,78.003 h1.2 r270
I6: Mechanical 3 "DESIGNATOR" at 117.348,42.443 h1.2 r270